# Allegro board SUB_NVP6158C_DVP_V1_0_0423_1359.brd

Outline 52 x 66.97 mm; copper layers: TOP, L2GND, L3, BOTTOM. Coordinates in mm from the lower left corner of the outline.
Outline path: 0,66.97 0,0 52,0 52,66.97 0,66.97

## Design rules (mm)
net group 1V2D_NP2: nets 1V2PLL_NP2 DVDD-CSI
net group 3V3A_NP2: nets 3V3A_NP2 AVDD-CSI-3V3
net group 3V3D_NP2: nets 3V3D_NP2 DVDD-CSI-3V3
net group 1V2A_V1_NP2: nets 1V2A_V1_NP2 1V2A_V2_NP2 1V2A_V3_NP2 1V2A_V4_NP2 1V2A_V5_NP2 AVDD-CSI
net group MG-CSI-100MIL: nets NCSI0-D0 NCSI0-D1 NCSI0-D2 NCSI0-D3 NCSI0-D4 NCSI0-D5 NCSI0-D6 NCSI0-D7 NCSI0-D8 NCSI0-D9 NCSI0-D10 NCSI0-D11 NCSI0-D12 NCSI0-D13 NCSI0-D14 NCSI0-D15 NCSI0-HSYNC NCSI0-PCLK NCSI0-VSYNC

## Placement (name value [footprint] x y rotation side)
C1  NC/0.1uF  [C0402]  14.82 30.98 0 top
C2  NC/22pF  [C0402]  17.49 35.86 90 top
C3  NC/10uF  [C0603]  14.7 32.07 0 top
C4  100nF  [C0402]  5.4 46.72 0 top
C5  100nF  [C0402]  27.14 36.37 90 top
C6  100nF  [C0402]  23.71 36.11 90 top
C7  100nF  [C0402]  22.83 36.11 90 top
C8  100nF  [C0402]  19.14 32.94 180 top
C9  100nF  [C0402]  32.48 36.11 90 top
C10  100nF  [C0402]  31.59 36.11 90 top
C11  100nF  [C0402]  28.03 36.37 90 top
C12  100nF  [C0402]  19.9 36.16 90 top
C13  100nF  [C0402]  5.53 40.16 0 top
C14  100nF  [C0402]  34.38 37.13 90 top
C15  100nF  [C0402]  33.96 35.73 180 top
C16  100nF  [C0402]  33.49 37.13 90 top
C17  100nF  [C0402]  30.57 37.38 90 top
C18  100nF  [C0402]  26.09 55.08 90 top
C19  100nF  [C0402]  30.19 35.98 180 top
C20  100nF  [C0402]  29.68 37.38 90 top
C21  100nF  [C0402]  26.25 36.87 90 top
C22  100nF  [C0402]  25.75 35.48 180 top
C23  100nF  [C0402]  25.37 36.87 90 top
C24  100nF  [C0402]  39.56 46.37 180 top
C25  100nF  [C0402]  21.81 37 90 top
C26  100nF  [C0402]  21.38 35.6 180 top
C27  100nF  [C0402]  20.92 37 90 top
C28  10uF  [C0402]  44.89 22.29 0 top
C29  10uF-6.3V  [C0402]  26.97 22.73 270 bottom
C30  100nF  [C0402]  29.28 22.75 270 bottom
C31  100nF  [C0402]  33.42 28.9 0 bottom
C32  100nF  [C0402]  30.95 22.73 270 bottom
C33  100nF  [C0402]  22.6 24.5 180 bottom
C34  100nF  [C0402]  22.39 27.09 180 bottom
C35  100nF  [C0402]  33.39 26.84 0 bottom
C36  10uF-6.3V  [C0402]  23.59 31.03 0 bottom
C37  100nF  [C0402]  23.59 29.99 0 bottom
C38  100nF  [C0402]  30.06 32.4 270 bottom
C39  100nF  [C0402]  28.87 32.4 270 bottom
C40  100nF  [C0402]  26.84 32.38 270 bottom
C41  100nF  [C0402]  24.25 32.38 270 bottom
C42  10uF-6.3V  [C0402]  31.28 28.64 180 bottom
C43  100nF  [C0402]  31.26 26.43 180 bottom
C44  100nF  [C0402]  30.24 24.65 90 bottom
C45  100nF  [C0402]  26.91 24.65 90 bottom
C46  100nF  [C0402]  23.94 26.05 0 bottom
C47  100nF  [C0402]  23.94 28.49 90 bottom
C48  10uF-6.3V  [C0402]  28.51 35.1 180 bottom
C49  NC-10uF  [C0603]  18.13 31.79 180 top
C50  100nF  [C0402]  28.51 34.21 180 bottom
C51  10uF-6.3V  [C0402]  26.18 34.16 180 bottom
C52  100nF  [C0402]  26.18 35.2 180 bottom
C53  10uF-6.3V  [C0402]  23.79 35.02 180 bottom
C54  100nF  [C0402]  23.79 34.13 180 bottom
C55  10uF-6.3V  [C0402]  21.68 30.9 90 bottom
C56  100nF  [C0402]  20.84 30.9 90 bottom
C57  NC-100nF  [C0402]  40.88 26.61 90 top
C58  10uF-6.3V  [C0402]  33.49 29.1 90 top
C59  100nF  [C0402]  34.29 29.1 90 top
C60  10uF-6.3V  [C0402]  34.64 33.7 90 top
C61  100nF  [C0402]  33.75 33.7 90 top
C62  NC/10uF  [C0603]  8.73 35.73 270 top
C63  NC/100nF  [C0402]  8.73 32.05 90 top
CC1  100nF  [C0402]  25.31 9.19 180 top
CC2  10uF  [C0603]  25.64 10.23 180 top
CC3  100nF  [C0402]  23.43 10.41 0 top
CC4  100nF  [C0402]  20.46 11.83 0 top
CC5  10uF  [C0603]  20.06 12.92 0 top
CC6  100nF  [C0402]  16.56 11.62 0 top
CC7  10uF  [C0603]  16.35 12.72 0 top
ESD1  ST5VLBD322  [SOD130_175H101]  46.18 46.78 0 top
ESD2  ST5VLBD322  [SOD130_175H101]  35.15 46.96 0 top
ESD3  ST5VLBD322  [SOD130_175H101]  22.91 46.93 0 top
ESD4  ST5VLBD322  [SOD130_175H101]  9.57 46.53 0 top
FB1  90@100M  [R0805]  21.05 15.21 90 top
FB2  90@100M  [R0805]  17.62 15.13 90 top
FB3  600R@100M-1A  [L0603]  39.26 31.18 180 top
FB4  600R@100M-1A  [L0603]  39.16 32.94 0 top
FB5  600R@100M-1A  [L0603]  42.26 34.41 270 top
FB6  600R@100M-1A  [L0603]  28.97 36.98 270 bottom
FB7  600R@100M-1A  [L0603]  26.61 36.98 270 bottom
FB8  600R@100M-1A  [L0603]  24.2 36.95 270 bottom
FB9  600R@100M-1A  [L0603]  19.8 31.24 270 bottom
FB10  600R@100M-1A  [L0603]  39.26 29.69 180 top
FB11  600R@100M-1A  [L0603]  35.78 33.98 270 top
FB12  120R@100M-1A  [L0603]  26.02 48.48 270 bottom
FB13  120R@100M-1A  [L0603]  26.18 52.5 270 top
H1  NC-HOLE  [MTH635D320]  43.79 5.24 0 top
H2  NC-HOLE  [MTH635D320]  8.21 21.01 0 top
J1  DIP  [BMW8B600_1890H700]  32.27 58.46 180 top
J2  DIP  [BMW8B600_1890H700]  19.99 58.46 180 top
J3  DIP  [BMW8B600_1890H700]  44.55 58.46 180 top
J4  NC-CON4/2.00MM/DIP_AL  [SKT1_4P200B250_850H400_V]  43.4 43.22 180 top
J5  NC-CON4/2.00MM/DIP_AL  [SKT1_4P200B250_850H400_V]  31.72 43.22 180 top
J6  NC-CON4/2.00MM/DIP_AL  [SKT1_4P200B250_850H400_V]  19.78 43.22 180 top
J7  NC-CON4/2.00MM/DIP_AL  [SKT1_4P200B250_850H400_V]  8.09 43.22 180 top
J8  DIP  [BMW8B600_1890H700]  7.71 58.46 180 top
JC1  DF40C-90DP-0.4V(58)  [SED90P40B185_1952H114-P]  26 13.12 180 bottom
L1  NC/2.2uH-2A  [LP200_250H100]  10.76 33.19 180 top
NOREF  -  []  1.49 6.77 0 top
NOREF#2  -  [unnamed#2]  50.51 3.22 0 top
NOREF#3  -  []  -0.42 -5.42 0 top
NOREF#4  -  [unnamed#2]  49.62 64.05 0 top
NOREF#5  -  []  0 66.97 0 top
NOREF#6  -  [unnamed#2]  2.38 64.05 0 top
NOREF#7  -  [unnamed#2]  4.03 5.25 0 top
NOREF#8  -  []  -11.21 -26.5 0 top
NOREF#9  -  []  52 0 90 top
NOREF#10  -  [unnamed#2]  4.03 5.25 180 bottom
NOREF#11  -  [unnamed#2]  2.38 64.05 180 bottom
NOREF#12  -  [unnamed#2]  49.62 64.05 180 bottom
NOREF#13  -  [unnamed#2]  50.51 3.22 180 bottom
OSC1  NC-27MHz-SMD  [X4B250_320H120_SMD]  38.42 27.17 270 top
Q1  BSN20  [SOT3P95B130_290H103]  44.58 29.29 90 top
Q2  BSN20  [SOT3P95B130_290H103]  45.07 24.85 180 top
Q3  MMBT3904  [SOT3P95B130_290H103]  44.62 20.17 90 top
R1  NC/100K-1%  [R0402]  16.6 35.86 90 top
R2  NC/100K-1%  [R0402]  17.11 34.33 180 top
R3  0R  [R0402]  46 40.43 180 top
R4  75R  [R0402]  31.59 38.02 270 top
R5  75R  [R0402]  12.92 40.02 90 top
R6  0.01R-1%  [R0603]  6.19 36.87 90 top
R7  0.01R-1%  [R0603]  7.46 36.87 90 top
R8  75R  [R0402]  44.57 39.99 90 top
R9  0R  [R0402]  34.29 40.46 180 top
R10  75R  [R0402]  32.32 40.46 0 top
R11  0.01R-1%  [R0603]  39.54 35.11 0 top
R12  75R  [R0402]  26.64 38.86 270 top
R13  0R  [R0402]  23.77 39.95 270 top
R14  75R  [R0402]  24.23 38.47 180 top
R15  0.01R-1%  [R0603]  37.15 33.7 270 top
R16  75R  [R0402]  22.83 38.02 270 top
R17  0R  [R0402]  11.54 40.51 0 top
R18  75R  [R0402]  17.24 32.94 0 top
R19  NC/4.7K  [R0402]  44.59 27.2 180 top
R20  2K  [R0402]  45.18 31.41 0 top
R21  NC/4.7K  [R0402]  47.16 25.01 270 top
R22  2K  [R0402]  42.99 24.63 270 top
R23  4.7K  [R0402]  45.9 17.87 180 top
R24  10K  [R0402]  43.95 17.87 0 top
R25  4.7K  [R0402]  42.99 22.83 90 top
R26  33R  [R0402]  19.14 22.78 270 top
R27  0R  [R0402]  37.27 23.56 0 top
R28  NC/0R  [R0402]  46.85 29.71 90 top
R29  NC/0R  [R0402]  46.57 27.22 180 top
R30  NC/0R  [R0402]  46.9 19.7 90 top
R31  NC-33R  [R0402]  30.19 21 270 top
R32  0R  [R0402]  31.21 21 90 top
R33  0R  [R0402]  35.32 23.56 180 top
R34  NC-22R  [R0402]  35.4 27.55 180 top
R35  33R  [R0402]  35.32 26.23 180 top
R36  0R  [R0402]  35.32 24.45 180 top
R37  0R  [R0402]  35.32 25.34 180 top
R38  NC-4K7  [R0402]  35.6 30.42 180 top
R39  4K7  [R0402]  35.6 31.31 180 top
R40  4K7  [R0402]  35.6 29.53 180 top
R41  NC-4K7  [R0402]  35.6 32.17 180 top
R42  NC-0R  [R0603]  14.57 29.13 270 top
R43  NC/0R  [R0603]  13.3 29.13 270 top
R44  NC/100K  [R0402]  14.06 36.62 0 top
R45  0R  [R0603]  6.19 34.21 90 top
R46  NC/0R  [R0603]  7.46 34.21 90 top
RC1  0R  [R0402]  32.86 9.82 90 top
RC2  0R  [R0402]  31.97 9.82 90 top
RC3  0R  [R0402]  28.11 11.07 180 top
RN1  33R*4  [RCA80-8]  18.13 29.25 0 top
RN2  33R*4  [RCA80-8]  18.13 25.57 0 top
RN3  33R*4  [RCA80-8]  23.59 20.49 90 top
RN4  33R*4  [RCA80-8]  27.27 20.62 90 top
U1  NC/SY8008B  [SOT5P95B160_300H130]  14.19 34.46 0 top
U2  NVP6158C  [QFN89P40B1000_1000H75]  27.4 28.49 270 top

## Library data of the parts
C1 C3 CC1-CC7 = CAPACITOR_0
C2 C62 C63 = C-C0402
C4-C27 C29-C48 C50-C56 C58-C61 = CAP NP_0
C28 = CAPACITOR_0: room: LVDS
C49 = CAPACITOR POL_1
C57 = CAPACITOR_0: room: TCARD
ESD1-ESD4 = 1_1.5KE100A
FB1 FB2 = INDUCTOR_3
FB3-FB11 = INDUCTOR: signal model: DEFAULT_INDUCTOR_0.001nH_1_2
FB12 FB13 = FERRITE BEAD_0
H1 H2 = HOLE
J1-J3 J8 = DIP-4PIN-360_6
J4-J7 = CON2_0
JC1 = MIPI_90_CON_F_1
L1 = L-L2520
OSC1 = OSC_2
Q1 Q2 = BSN20_0
Q3 = NPN-MMBT3904_0
R1 R2 = R-R0402-1%
R3-R5 R8-R10 R12-R14 R16-R18 R26 R31-R41 = R: room: TCARD
R6 R7 R11 R15 = R-R0603-1%
R19-R25 R27-R30 R44 = R-R0402-5%
R42 R43 = R/0603_2: room: SII9616
R45 R46 = R-R0603-5%
RC1-RC3 = R
RN1-RN4 = R-PACK4_1: User Part Number: pn; Tolerance: RichardLC; room: TCARD
U1 = SY8008B
U2 = RAPTOR3_2

## Footprints (pads in the part's own frame, mm; a bottom-side part is the same pattern mirrored in y, then rotated)
BMW8B600_1890H700
  round 2.2 hole 2.2 unplated: (0,-0.05) (0,-6.15)
  round 1.2 hole 0.8: 1(0.8,7.25) 2(-0.8,7.25) 3(-0.8,5.25) 4(0.8,5.25)
  rect 1.4x2.5 hole 0.7x1.3: 5(2.9,7.5) 6(-2.9,7.5) 7(-2.9,-2.3) 8(2.9,-2.3)
C0402
  rect 0.5x0.5 smd: 1(-0.425,0) 2(0.425,0)
C0603
  rect 0.76x0.76 smd: 1(-0.71,0) 2(0.71,0)
L0603
  rect 0.76x0.76 smd: 1(-0.71,0) 2(0.71,0)
LP200_250H100
  rect 0.8x2 smd: 1(-1,0) 2(1,0)
MTH635D320
  round 6.35 hole 3.2: 1(0,0)
QFN89P40B1000_1000H75
  rect 0.6x0.2 smd: 1(-4.9,4.2) 2(-4.9,3.8) 3(-4.9,3.4) 4(-4.9,3) 5(-4.9,2.6) 6(-4.9,2.2) 7(-4.9,1.8) 8(-4.9,1.4) 9(-4.9,1) 10(-4.9,0.6) 11(-4.9,0.2) 12(-4.9,-0.2) 13(-4.9,-0.6) 14(-4.9,-1) 15(-4.9,-1.4) 16(-4.9,-1.8) 17(-4.9,-2.2) 18(-4.9,-2.6) 19(-4.9,-3) 20(-4.9,-3.4) 21(-4.9,-3.8) 22(-4.9,-4.2) 45(4.9,-4.2) 46(4.9,-3.8) 47(4.9,-3.4) 48(4.9,-3) 49(4.9,-2.6) 50(4.9,-2.2) 51(4.9,-1.8) 52(4.9,-1.4) 53(4.9,-1) 54(4.9,-0.6) 55(4.9,-0.2) 56(4.9,0.2) 57(4.9,0.6) 58(4.9,1) 59(4.9,1.4) 60(4.9,1.8) 61(4.9,2.2) 62(4.9,2.6) 63(4.9,3) 64(4.9,3.4) 65(4.9,3.8) 66(4.9,4.2)
  rect 0.2x0.6 smd: 23(-4.2,-4.9) 24(-3.8,-4.9) 25(-3.4,-4.9) 26(-3,-4.9) 27(-2.6,-4.9) 28(-2.2,-4.9) 29(-1.8,-4.9) 30(-1.4,-4.9) 31(-1,-4.9) 32(-0.6,-4.9) 33(-0.2,-4.9) 34(0.2,-4.9) 35(0.6,-4.9) 36(1,-4.9) 37(1.4,-4.9) 38(1.8,-4.9) 39(2.2,-4.9) 40(2.6,-4.9) 41(3,-4.9) 42(3.4,-4.9) 43(3.8,-4.9) 44(4.2,-4.9) 67(4.2,4.9) 68(3.8,4.9) 69(3.4,4.9) 70(3,4.9) 71(2.6,4.9) 72(2.2,4.9) 73(1.8,4.9) 74(1.4,4.9) 75(1,4.9) 76(0.6,4.9) 77(0.2,4.9) 78(-0.2,4.9) 79(-0.6,4.9) 80(-1,4.9) 81(-1.4,4.9) 82(-1.8,4.9) 83(-2.2,4.9) 84(-2.6,4.9) 85(-3,4.9) 86(-3.4,4.9) 87(-3.8,4.9) 88(-4.2,4.9)
  rect 5.75x5.75 smd: 89(0,0)
R0402
  rect 0.5x0.5 smd: 1(-0.425,0) 2(0.425,0)
R0603
  rect 0.76x0.76 smd: 1(-0.71,0) 2(0.71,0)
R0805
  rect 0.9x1.3 smd: 1(-0.95,0) 2(0.95,0)
RCA80-8
  rect 1x0.5 smd: 1(-0.9,1.2) 2(-0.9,0.4) 3(-0.9,-0.4) 4(-0.9,-1.2) 5(0.9,-1.2) 6(0.9,-0.4) 7(0.9,0.4) 8(0.9,1.2)
SED90P40B185_1952H114-P
  rect 0.23x0.66 smd: 1(-8.8,1.355) 2(-8.8,-1.355) 3(-8.4,1.355) 4(-8.4,-1.355) 5(-8,1.355) 6(-8,-1.355) 7(-7.6,1.355) 8(-7.6,-1.355) 9(-7.2,1.355) 10(-7.2,-1.355) 11(-6.8,1.355) 12(-6.8,-1.355) 13(-6.4,1.355) 14(-6.4,-1.355) 15(-6,1.355) 16(-6,-1.355) 17(-5.6,1.355) 18(-5.6,-1.355) 19(-5.2,1.355) 20(-5.2,-1.355) 21(-4.8,1.355) 22(-4.8,-1.355) 23(-4.4,1.355) 24(-4.4,-1.355) 25(-4,1.355) 26(-4,-1.355) 27(-3.6,1.355) 28(-3.6,-1.355) 29(-3.2,1.355) 30(-3.2,-1.355) 31(-2.8,1.355) 32(-2.8,-1.355) 33(-2.4,1.355) 34(-2.4,-1.355) 35(-2,1.355) 36(-2,-1.355) 37(-1.6,1.355) 38(-1.6,-1.355) 39(-1.2,1.355) 40(-1.2,-1.355) 41(-0.8,1.355) 42(-0.8,-1.355) 43(-0.4,1.355) 44(-0.4,-1.355) 45(0,1.355) 46(0,-1.355) 47(0.4,1.355) 48(0.4,-1.355) 49(0.8,1.355) 50(0.8,-1.355) 51(1.2,1.355) 52(1.2,-1.355) 53(1.6,1.355) 54(1.6,-1.355) 55(2,1.355) 56(2,-1.355) 57(2.4,1.355) 58(2.4,-1.355) 59(2.8,1.355) 60(2.8,-1.355) 61(3.2,1.355) 62(3.2,-1.355) 63(3.6,1.355) 64(3.6,-1.355) 65(4,1.355) 66(4,-1.355) 67(4.4,1.355) 68(4.4,-1.355) 69(4.8,1.355) 70(4.8,-1.355) 71(5.2,1.355) 72(5.2,-1.355) 73(5.6,1.355) 74(5.6,-1.355) 75(6,1.355) 76(6,-1.355) 77(6.4,1.355) 78(6.4,-1.355) 79(6.8,1.355) 80(6.8,-1.355) 81(7.2,1.355) 82(7.2,-1.355) 83(7.6,1.355) 84(7.6,-1.355) 85(8,1.355) 86(8,-1.355) 87(8.4,1.355) 88(8.4,-1.355) 89(8.8,1.355) 90(8.8,-1.355)
  rect 0.35x0.66 smd: 91(-9.275,1.355) 92(-9.275,-1.355) 93(9.275,1.355) 94(9.275,-1.355)
SKT1_4P200B250_850H400_V
  round 1.4 hole 0.8: 1(-3,0) 2(-1,0) 3(1,0) 4(3,0)
SOD130_175H101
  rect 0.8x0.8 smd: 1(-1.1,0) 2(1.1,0)
SOT3P95B130_290H103
  rect 0.95x0.46 smd: 1(-0.975,0.95) 2(-0.975,-0.95) 3(0.975,0)
SOT5P95B160_300H130
  rect 0.8x0.55 smd: 1(-1.2,0.95) 2(-1.2,0) 3(-1.2,-0.95) 4(1.2,-0.95) 5(1.2,0.95)
unnamed#2
  round 0.76 smd: (0,0)
X4B250_320H120_SMD
  rect 0.95x1.2 smd: 1(-0.875,1.1) 2(-0.875,-1.1) 3(0.875,-1.1) 4(0.875,1.1)

## Nets
1V2A_V1_NP2: C48.1 C50.1 FB6.2 U2.6(VDD1A_1)
1V2A_V2_NP2: C51.1 C52.1 FB7.2 U2.12(VDD1A_2)
1V2A_V3_NP2: C53.1 C54.1 FB8.2 U2.18(VDD1A_3)
1V2A_V4_NP2: C55.1 C56.1 FB9.2 U2.30(VDD1A_4)
1V2A_V5_NP2: C60.1 C61.1 FB11.2 U2.88(VDD1A_5)
1V2D_NP2: C29.1 C30.1 C31.1 C32.1 C33.1 C34.1 C35.1 FB3.2 U2.35(VDD1D_1) U2.46(VDD1D_2) U2.57(VDD1D_3) U2.58(VDD1D_4) U2.66(VDD1D_5) U2.75(VDD1D_6) U2.79(VDD1D_7)
1V2PLL_NP2: C58.1 C59.1 FB10.2 U2.78(VDD1A-PLL)
3V3A_NP2: C36.1 C37.1 C38.1 C39.1 C40.1 C41.1 FB4.2 U2.3(VDD3A_1) U2.9(VDD3A_2) U2.15(VDD3A_3) U2.21(VDD3A_4) U2.29(VDD3A_5) U2.31(VDD3A_6)
3V3D_NP2: C42.1 C43.1 C44.1 C45.1 C46.1 C47.1 FB5.2 U2.34(VDD3D_1) U2.45(VDD3D_2) U2.56(VDD3D_3) U2.65(VDD3D_4) U2.74(VDD3D_5) U2.80(VDD3D_6)
AVDD-CSI: FB6.1 FB7.1 FB8.1 FB9.1 FB11.1 R7.2
AVDD-CSI-3V3: C57.1 FB4.1 OSC1.4(VCC) R15.2 R38.1 R39.1
DVDD-CSI: FB3.1 FB10.1 R6.2
DVDD-CSI-1V2: CC3.2 JC1.56(P56) JC1.58(P58) R45.1
DVDD-CSI-3V3: FB5.1 R11.2 R20.2 R22.2 R25.2
GND: C1.1 C3.1 C4.2 C13.2 C14.2 C16.2 C17.2 C18.2 C20.2 C21.2 C23.2 C24.2 C25.2 C27.2 C28.2 C29.2 C30.2 C31.2 C32.2 C33.2 C34.2 C35.2 C36.2 C37.2 C38.2 C39.2 C40.2 C41.2 C42.2 C43.2 C44.2 C45.2 C46.2 C47.2 C48.2 C49.2 C50.2 C51.2 C52.2 C53.2 C54.2 C55.2 C56.2 C57.2 C58.2 C59.2 C60.2 C61.2 C62.1 C63.1 CC1.1 CC2.1 CC3.1 CC4.1 CC5.1 CC6.1 CC7.1 ESD1.2(CATHODE) ESD2.2(CATHODE) ESD3.2(CATHODE) ESD4.2(CATHODE) FB12.2 FB13.2 H1.1 H2.1 J1.5(GND0) J1.6(GND1) J1.7(GND2) J1.8(GND3) J2.5(GND0) J2.6(GND1) J2.7(GND2) J2.8(GND3) J3.5(GND0) J3.6(GND1) J3.7(GND2) J3.8(GND3) J4.2 J5.2 J6.2 J7.2 J8.5(GND0) J8.6(GND1) J8.7(GND2) J8.8(GND3) JC1.1(P1) JC1.7(P7) JC1.10(P10) JC1.13(P13) JC1.14(P14) JC1.18(P18) JC1.19(P19) JC1.20(P20) JC1.25(P25) JC1.26(P26) JC1.28(P28) JC1.30(P30) JC1.31(P31) JC1.36(P36) JC1.37(P37) JC1.40(P40) JC1.42(P42) JC1.43(P43) JC1.46(P46) JC1.49(P49) JC1.50(P50) JC1.54(P54) JC1.55(P55) JC1.60(P60) JC1.61(P61) JC1.62(P62) JC1.64(P64) JC1.67(P67) JC1.73(P73) JC1.74(P74) JC1.76(P76) JC1.78(P78) JC1.79(P79) JC1.80(P80) JC1.82(P82) JC1.85(P85) JC1.91(P91) JC1.92(P92) JC1.93(P93) JC1.94(P94) OSC1.2(GND) R2.2 R4.1 R5.1 R8.1 R10.1 R12.1 R14.1 R16.1 R18.1 R40.1 R41.1 U1.2(GND) U2.87(TEST) U2.89(PGND)
VCC-1V2: C2.2 C62.2 C63.2 L1.2 R1.2 R46.1
VCC-3V3-DEV: FB2.2 R11.1 R15.1 R42.2
VCC-5V: C4.1 C13.1 C18.1 C24.1 FB1.2 J1.4(VCC) J2.4(VCC) J3.4(VCC) J4.4 J5.4 J6.4 J7.4 J8.4(VCC) R43.2
VCCIO-CAM: CC1.2 CC2.2 JC1.52(P52) Q1.1(GATE) Q2.1(GATE) R19.2 R21.2 R23.2 R24.2
AHD-ADC-REFCLK: OSC1.3(OUT) R34.1
AHD-I2C-SCL: Q1.3(DRAIN) R20.1 R28.2 R37.1
AHD-I2C-SDA: Q2.3(DRAIN) R22.1 R29.2 R36.1
AHD-NCSI0-MCLK: JC1.11(P11) R35.1
AHD-SYS-RSTN: R27.1 R33.1
HD1: ESD1.1(ANODE) J3.2(CVBS) J4.1 R3.1
HD2: ESD2.1(ANODE) J1.2(CVBS) J5.1 R9.1
HD3: ESD3.1(ANODE) J2.2(CVBS) J6.1 R13.1
HD4: ESD4.1(ANODE) J7.1 J8.2(CVBS) R17.1
NCSI0-D0: JC1.15(P15) RN1.1(R1)
NCSI0-D1: JC1.17(P17) RN1.2(R2)
NCSI0-D2: JC1.3(P3) RN1.3(R3)
NCSI0-D3: JC1.5(P5) RN1.4(R4)
NCSI0-D4: JC1.27(P27) RN2.1(R1)
NCSI0-D5: JC1.29(P29) RN2.2(R2)
NCSI0-D6: JC1.33(P33) RN2.3(R3)
NCSI0-D7: JC1.35(P35) RN2.4(R4)
NCSI0-D8: JC1.39(P39) RN3.1(R1)
NCSI0-D9: JC1.41(P41) RN3.2(R2)
NCSI0-D10: JC1.45(P45) RN3.3(R3)
NCSI0-D11: JC1.47(P47) RN3.4(R4)
NCSI0-D12: JC1.51(P51) RN4.1(R1)
NCSI0-D13: JC1.53(P53) RN4.2(R2)
NCSI0-D14: JC1.57(P57) RN4.3(R3)
NCSI0-D15: JC1.59(P59) RN4.4(R4)
NCSI0-HSYNC: JC1.21(P21)
NCSI0-PCLK: JC1.9(P9) R26.2 R31.2
NCSI0-VSYNC: JC1.23(P23)
NCSI-I2C-SCL: JC1.8(P8) Q1.2(SOURCE) R19.1 R28.1
NCSI-I2C-SDA: JC1.6(P6) Q2.2(SOURCE) R21.1 R29.1
PE15: RC1.1
PK22: RC3.1
RSTN: Q3.2(E) R23.1 R30.1 RC2.1
S_GND: FB12.1 J1.1(GND) J2.1(GND) J3.1(GND) J8.1(GND)
SS_GND: FB13.1 J1.3(DET) J2.3(DET) J3.3(DET) J8.3(DET)
N19621503: R36.2 U2.72(SDA)
N19621508: R37.2 U2.73(SCL)
N19621532: R38.2 R40.2 U2.85(SA0)
N19621534: R39.2 R41.2 U2.86(SA1)
N19621611: C9.2 R3.2 R8.2
N19621702: C11.2 R9.2 R10.2
N19621721: C7.2 R16.2
N19621766: C6.2 R13.2 R14.2
N19621772: RN1.8(R8) U2.36(VDO2-0)
N19621774: RN1.7(R7) U2.37(VDO2-1)
N19621776: RN1.6(R6) U2.38(VDO2-2)
N19621778: RN1.5(R5) U2.39(VDO2-3)
N19621780: RN2.8(R8) U2.40(VDO2-4)
N19621782: RN2.7(R7) U2.41(VDO2-5)
N19621784: RN3.8(R8) U2.47(VDO3-0)
N19621786: RN3.7(R7) U2.48(VDO3-1)
N19621788: RN3.6(R6) U2.49(VDO3-2)
N19621790: RN3.5(R5) U2.50(VDO3-3)
N19621792: RN4.8(R8) U2.51(VDO3-4)
N19621794: RN4.7(R7) U2.52(VDO3-5)
N19621798: RN4.6(R6) U2.53(VDO3-6)
N19621800: RN4.5(R5) U2.54(VDO3-7)
N19621804: RN2.6(R6) U2.42(VDO2-6)
N19621806: RN2.5(R5) U2.43(VDO2-7)
N19621808: R26.1 U2.44(VCLK2)
N19621810: R31.1 U2.55(VCLK3)
N19621815: C12.2 R5.2 R17.2
N19621866: R34.2 R35.2 U2.76(SYS-CLK)
N19622220: C49.1 U2.33(VREF)
N19622226: C9.1 U2.4(VIN1)
N19622228: C11.1 U2.10(VIN2)
N19622230: C10.1 U2.5(VCM1)
N19622263: R33.2 U2.71(RSTB)
N19622273: R32.2 U2.59(IRQ)
N19622360: C6.1 U2.16(VIN3)
N19622362: C7.1 U2.17(VCM3)
N19622364: C12.1 U2.22(VIN4)
N19622366: C8.1 U2.23(VCM4)
N19622368: C8.2 R18.2
N19622370: C10.2 R4.2
N19622372: C14.1 C15.1 U2.1(REFT1)
N19622376: C15.2 C16.1 U2.2(REFB1)
N19622380: C17.1 C19.1 U2.7(REFT2)
N19622384: C19.2 C20.1 U2.8(REFB2)
N19622388: C21.1 C22.1 U2.13(REFT3)
N19622392: C22.2 C23.1 U2.14(REFB3)
N19622396: C25.1 C26.1 U2.19(REFT4)
N19622400: C26.2 C27.1 U2.20(REFB4)
N24481592: JC1.12(P12) RC1.2
N24481626: JC1.48(P48) RC3.2
N24481661: JC1.16(P16) RC2.2
N24481697: CC4.2 CC5.2 FB1.1 JC1.66(P66) JC1.68(P68) JC1.70(P70) JC1.72(P72)
N24481712: CC6.2 CC7.2 FB2.1 JC1.84(P84) JC1.86(P86) JC1.88(P88) JC1.90(P90)
N24486605: R6.1 R7.1 R45.2 R46.2
N24498521: C5.1 U2.11(VCM2)
N24498524: C5.2 R12.2
N24503610: C28.1 Q3.3(C) R25.1 R27.2 R30.2
N24503716: Q3.1(B) R24.1
N24516822: C2.1 R1.1 R2.1 U1.5(FB)
N24516872: C1.2 C3.2 R42.1 R43.1 R44.2 U1.4(IN)
N24516874: L1.1 U1.3(LX)
N24516932: R44.1 U1.1(EN)

Pads without a net: J4 3; J5 3; J6 3; J7 3; JC1 2 4 22 24 32 34 38 44 63 65 69 71 75 77 81 83 87 89; OSC1 1; R32 1; U2 24 25 26 27 28 32 60 61 62 63 64 67 68 69 70 77 81 82 83 84

## Via types
v1: diameter 0.406, hole 0.203, TOP to BOTTOM, 672 vias

## Routing (per net, layer and track width the routed paths; a pad name or vN(x,y) marks a point on that pad's centre or on a via; arc(x,y) is an arc through that point)
1V2A_V1_NP2: length 3.5
  TOP w0.203: U2.6 v1(29.6,34.12)
  BOTTOM w0.508: FB6.2 28.97,35.13 C48.1 C50.1 29.51,34.21 v1(29.6,34.12)
1V2A_V2_NP2: length 3.4
  TOP w0.203: U2.12 v1(27.2,34)
  BOTTOM w0.508: v1(27.2,34) 27.04,34.16 C51.1 C52.1 26.61,35.2 FB7.2
1V2A_V3_NP2: length 3.4
  TOP w0.203: U2.18 v1(24.8,34.11)
  BOTTOM w0.508: FB8.2 24.2,35.04 C53.1 C54.1 24.77,34.13 v1(24.8,34.11)
1V2A_V4_NP2: length 3.2
  TOP w0.203: U2.30 v1(21.78,29.89)
  BOTTOM w0.508: FB9.2 20.8,30.53 C56.1 C55.1 21.68,29.99 v1(21.78,29.89)
1V2A_V5_NP2: length 3.7
  TOP w0.203: 32.99,32.94 32.74,32.69 U2.88
  TOP w0.508: 32.99,32.94 33.32,33.27 C61.1 C60.1 35.75,33.27 35.75,33.27 FB11.2
1V2D_NP2: length 30.7
  TOP w0.203: v1(23.84,24.22) 23.8,24.22 23.6,24.02 U2.46 ; U2.35 22.93,27.89 23.13,27.69 v1(23.13,27.63) ; U2.57 28,23.1 v1(27.88,22.98) ; U2.66 v1(32.05,23.59) ; v1(28.51,22.95) 28.4,23.07 U2.58 ; v1(32.91,29.46) 32.91,29.39 32.61,29.09 U2.79 ; U2.75 v1(32.95,27.49)
  TOP w0.508: FB3.2 37.79,31.18 37.74,31.13 37.74,31.13 v1(36.8,30.19)
  L3 w0.508: v1(32.91,29.46) 34.28,29.46 35.02,30.19 v1(36.8,30.19)
  BOTTOM w0.508: v1(32.91,29.46) 32.99,29.38 32.99,29 32.99,28.99 C31.1 32.95,28.86 v1(32.95,27.49) 32.97,27.48 C35.1 32.97,24.51 v1(32.05,23.59) 31.61,23.16 C32.1 30.93,23.18 C30.1 28.74,23.18 v1(28.51,22.95) 27.91,22.95 v1(27.88,22.98) 27.71,23.15 C29.1 24.91,23.15 v1(23.84,24.22) 23.56,24.5 C33.1 22.83,24.7 22.83,26.46 22.82,26.46 C34.1 22.82,27.32 v1(23.13,27.63)
1V2PLL_NP2: length 6.7
  TOP w0.203: 32.86,28.69 U2.78
  TOP w0.508: 32.86,28.69 32.87,28.68 C58.1 C59.1 34.29,28.71 34.48,28.9 36.82,28.9 36.85,28.92 37.13,28.92 37.89,29.69 FB10.2
3V3A_NP2: length 25.1
  TOP w0.203: v1(23.16,30.55) 23.16,30.5 22.96,30.29 U2.29 ; U2.15 26,32.83 v1(25.97,32.8) ; v1(23.16,29.41) 23.06,29.41 22.97,29.49 U2.31 ; U2.9 28.4,32.9 v1(28.21,32.71) ; U2.21 23.6,32.82 v1(23.54,32.76) ; U2.3 v1(30.8,32.79)
  TOP w0.508: v1(39.49,32.2) 39.87,32.58 FB4.2
  L3 w0.508: v1(30.8,32.79) 31.05,33.04 37.63,33.04 38.47,32.2 v1(39.49,32.2)
  BOTTOM w0.508: v1(23.16,29.41) 23.16,29.81 23.16,29.81 C37.1 23.16,29.99 v1(23.16,30.55) 23.13,30.57 23.13,31 C36.1 23.13,31.06 23.13,32.36 v1(23.54,32.76) 23.58,32.8 C41.1 v1(25.97,32.8) C40.1 28.12,32.8 v1(28.21,32.71) 28.33,32.83 C39.1 C38.1 30.76,32.83 v1(30.8,32.79)
3V3D_NP2: length 39.2
  TOP w0.203: 23.2,24.3 U2.45 ; v1(30.91,24.3) 31.05,24.3 31.2,24.16 U2.65 ; U2.74 v1(31.69,27.09) ; v1(31.69,29.28) 31.69,29.3 31.88,29.49 U2.80 ; U2.34 v1(23.18,28.29) ; v1(27.6,24.2) U2.56
  TOP w0.508: v1(23.48,25.32) 23.2,25.04 23.2,24.3 ; FB5.2 v1(42.26,32.76)
  L3 w0.508: v1(31.69,29.28) 31.69,30.24 32.86,31.41 37.05,31.41 39.46,29 40.68,29 42.26,30.57 v1(42.26,32.76)
  BOTTOM w0.508: v1(31.69,29.28) 31.71,29.27 C42.1 31.71,27.11 v1(31.69,27.09) 31.68,27.09 C43.1 31.68,25.07 v1(30.91,24.3) 30.83,24.3 30.75,24.22 C44.1 30.22,24.2 v1(27.6,24.2) 27.57,24.22 C45.1 24.96,24.22 23.86,25.32 v1(23.48,25.32) 23.52,25.36 C46.1 23.52,27.05 23.94,27.48 C47.1 23.78,28.07 23.56,28.29 v1(23.18,28.29)
AVDD-CSI: length 37.4
  TOP w0.508: v1(19.46,34.48) 18.25,35.68 18.25,36.62 17.29,37.59 15.21,37.59 15.03,37.76 12.67,37.76 12.49,37.59 7.46,37.59 R7.2 ; FB11.1 35.78,37.66 v1(35.75,37.69)
  L3 w0.508: v1(32.32,37.69) v1(35.75,37.69)
  BOTTOM w0.508: v1(32.32,37.69) FB6.1 FB7.1 24.22,37.69 FB8.1 22.42,37.66 19.46,34.7 v1(19.46,34.48) 19.8,34.13 FB9.1
AVDD-CSI-3V3: length 17.8
  TOP w0.508: R38.1 R39.1 36.89,31.31 37.4,31.82 37.4,32.54 37.15,32.79 R15.2 37.2,32.94 FB4.1 39.5,33.99 40.66,33.99 41.16,33.49 41.16,29.18 41.77,28.57 41.77,26.94 41.49,26.66 41.49,26.64 41.04,26.19 C57.1 40.78,26.3 OSC1.4
DVDD-CSI: length 42.2
  TOP w0.508: FB10.1 39.97,30.42 v1(39.94,30.45) 39.97,30.47 FB3.1 ; v1(18.89,37.64) 17.62,38.91 6.7,38.91 6.19,38.4 R6.2
  L3 w0.508: v1(18.89,37.64) 19.98,36.54 36.9,36.54 40.61,32.84 40.61,30.96 40.1,30.45 v1(39.94,30.45)
DVDD-CSI-1V2: length 43
  TOP w0.508: R45.1 6.19,28.87 13.68,21.38 13.68,9.31 15.19,7.81 v1(23.86,7.81) ; v1(23.77,11.04) 23.86,10.95 CC3.2 v1(23.86,9.59)
  L3 w0.508: v1(23.86,9.59) v1(23.86,7.81)
  BOTTOM w0.254: JC1.58 23.6,11.21 v1(23.77,11.04) 24,11.28 JC1.56
DVDD-CSI-3V3: length 18.1
  TOP w0.508: R25.2 R22.2 43.9,24.21 v1(43.98,24.12) ; v1(45.53,30.7) 45.53,31.34 R20.2 45.6,32.04 45.53,32.12 45.53,33.68 44.09,35.12 FB5.1 42.21,35.12 42.2,35.11 R11.2
  L3 w0.508: v1(45.53,30.7) 45.53,30.54 43.98,29 v1(43.98,24.12)
GND: length 508.4
  TOP w0.114: 21.96,15.44 22.01,15.49 22.01,17.65
  TOP w0.203: U2.87 v1(32.97,32.29) ; U1.2 13.43,34.46 v1(13.81,34.08)
  TOP w0.254: R5.1 v1(13.5,39.59) ; v1(20,11.12) 20.04,11.16 CC4.1 ; CC5.1 19.95,12.92 v1(20.03,12.92) ; v1(40.3,25.57) 40.25,25.57 40.22,25.55 38.6,25.55 v1(38.4,25.75) 38.19,25.55 36.67,25.55 36.29,25.93 36.29,26.51 35.88,26.92 v1(35.4,26.92)
  TOP w0.508: v1(22.27,38.6) 22.29,38.6 22.62,38.27 22.65,38.27 R16.1 ; C4.2 v1(5.82,47.35) ; J8.7 10.61,62.19 ; J8.7 9.73,60.76 ; J8.7 11.49,60.76 ; J8.7 10.61,59.34 ; 28.49,50.96 J1.5 ; J1.5 30.25,50.96 ; J1.5 29.37,49.54 ; J1.5 29.37,52.39 ; J8.8 4.81,62.19 ; J8.8 5.69,60.76 ; J8.8 3.93,60.76 ; J8.8 4.81,59.34 ; J8.5 5.69,50.96 ; J8.5 4.81,52.39 ; J8.5 4.81,49.54 ; J8.5 3.93,50.96 ; R41.1 v1(36.67,32.17) ; J2.8 17.97,60.76 ; J2.8 17.09,59.34 ; J2.8 16.21,60.76 ; J2.8 17.09,62.19 ; R10.1 31.89,40.53 31.77,40.66 v1(31.77,41.17) ; CC3.1 23.01,10.01 v1(22.85,9.85) ; J2.7 22.89,62.19 ; J2.7 22.01,60.76 ; J2.7 23.77,60.76 ; J2.7 22.89,59.34 ; H1.1 43.79,8.59 ; H1.1 40.44,5.24 ; H1.1 43.79,1.88 ; H1.1 47.14,5.24 ; 28.49,60.76 J1.8 ; J1.8 29.37,62.19 ; J1.8 30.25,60.76 ; J1.8 29.37,59.34 ; J3.8 42.53,60.76 ; J3.8 40.77,60.76 ; J3.8 41.65,62.19 ; J3.8 41.65,59.34 ; 10.61,49.54 J8.6 ; J8.6 9.73,50.96 ; J8.6 10.61,52.39 ; J8.6 11.49,50.96 ; CC6.1 v1(15.51,11.62) ; J4.2 45.28,43.22 ; J4.2 43.52,43.22 ; J4.2 44.4,44.1 ; J4.2 44.4,42.35 ; CC2.1 v1(27.17,10.23) ; 8.21,43.22 J7.2 ; J7.2 9.97,43.22 ; J7.2 9.09,44.1 ; J7.2 9.09,42.35 ; C18.2 v1(26.98,55.5) ; J5.2 33.59,43.22 ; J5.2 32.72,42.35 ; J5.2 32.72,44.1 ; J5.2 31.84,43.22 ; J2.5 17.97,50.96 ; J2.5 17.09,52.39 ; J2.5 16.21,50.96 ; J2.5 17.09,49.54 ; 35.17,59.34 J1.7 ; J1.7 35.17,62.19 ; J1.7 36.05,60.76 ; J1.7 34.29,60.76 ; 47.45,59.34 J3.7 ; J3.7 48.33,60.76 ; J3.7 46.57,60.76 ; J3.7 47.45,62.19 ; R4.1 v1(31.59,39.08) ; J1.6 35.17,52.39 ; J1.6 35.17,49.54 ; J1.6 36.05,50.96 ; J1.6 34.29,50.96 ; v1(35.25,28.24) 36.26,28.24 36.45,28.05 OSC1.2 37.42,28.05 v1(38.05,28.68) 38.29,28.92 40.25,28.92 40.83,28.34 v1(40.83,27.7) 40.83,27.09 C57.2 ; 46.57,50.96 J3.6 ; J3.6 47.45,49.54 ; J3.6 47.45,52.39 ; J3.6 48.33,50.96 ; R8.1 v1(45.23,39.57) ; 8.21,24.37 H2.1 11.56,21.01 ; C21.2 C23.2 v1(25.37,38.25) ; R14.1 v1(24.65,39.21) ; ESD3.2 v1(24.91,46.93) ; v1(39.14,47.17) 39.14,47.17 C24.2 ; C60.2 34.64,34.27 v1(34.19,34.72) 33.75,34.28 C61.2 ; J2.6 23.77,50.96 ; J2.6 22.89,49.54 ; J2.6 22.89,52.39 ; J2.6 22.01,50.96 ; C58.2 33.49,29.79 v1(33.85,30.14) 34.26,29.74 34.26,29.56 C59.2 ; C13.2 v1(5.95,40.93) ; R40.1 v1(36.64,29.53) ; ESD2.2 v1(35.42,46.96) ; ESD1.2 v1(47.28,47.68) ; 41.65,49.54 J3.5 ; J3.5 42.53,50.96 ; J3.5 40.77,50.96 ; J3.5 41.65,52.39 ; R18.1 v1(16.81,33.55) ; CC7.1 v1(15.64,13.51) ; C27.2 v1(20.92,38.04) ; 20.78,42.35 J6.2 ; J6.2 19.9,43.22 ; J6.2 20.78,44.1 ; J6.2 21.66,43.22 ; v1(16.6,31.54) 16.86,31.79 C49.2 ; ESD4.2 v1(11.52,46.53) ; C17.2 v1(30.57,38.42) ; R12.1 v1(26.03,39.29) ; C25.2 v1(21.81,38.09) ; FB13.2 v1(27.13,51.79) ; C14.2 v1(34.38,38.32) ; C16.2 v1(33.49,38.32) ; CC1.1 v1(26.48,9.19) ; C20.2 v1(29.68,38.45) ; C28.2 v1(45.96,22.29)
  L2GND w0.508: J3.7 47.45,62.19 ; J3.7 46.57,60.76 ; J3.7 47.45,59.34 ; J3.7 48.33,60.76 ; 29.37,49.54 J1.5 ; J1.5 29.37,52.39 ; J1.5 30.25,50.96 ; J1.5 28.49,50.96 ; 41.65,49.54 J3.5 ; J3.5 40.77,50.96 ; J3.5 41.65,52.39 ; J3.5 42.53,50.96 ; J1.6 35.17,52.39 ; J1.6 34.29,50.96 ; J1.6 35.17,49.54 ; J1.6 36.05,50.96 ; J1.8 29.37,62.19 ; J1.8 30.25,60.76 ; J1.8 29.37,59.34 ; J1.8 28.49,60.76 ; 10.61,59.34 J8.7 ; J8.7 10.61,62.19 ; J8.7 9.73,60.76 ; J8.7 11.49,60.76 ; 47.45,49.54 J3.6 ; J3.6 46.57,50.96 ; J3.6 47.45,52.39 ; J3.6 48.33,50.96 ; J8.5 5.69,50.96 ; J8.5 4.81,49.54 ; J8.5 4.81,52.39 ; J8.5 3.93,50.96 ; J2.7 23.77,60.76 ; J2.7 22.01,60.76 ; J2.7 22.89,59.34 ; J2.7 22.89,62.19 ; J3.8 42.53,60.76 ; J3.8 40.77,60.76 ; J3.8 41.65,59.34 ; J3.8 41.65,62.19 ; 17.09,59.34 J2.8 ; J2.8 17.09,62.19 ; J2.8 16.21,60.76 ; J2.8 17.97,60.76 ; 8.21,43.22 J7.2 ; J7.2 9.09,44.1 ; J7.2 9.97,43.22 ; J7.2 9.09,42.35 ; 44.4,42.35 J4.2 ; J4.2 43.52,43.22 ; J4.2 45.28,43.22 ; J4.2 44.4,44.1 ; J2.5 17.09,52.39 ; J2.5 16.21,50.96 ; J2.5 17.97,50.96 ; J2.5 17.09,49.54 ; J5.2 33.59,43.22 ; J5.2 32.72,44.1 ; J5.2 31.84,43.22 ; J5.2 32.72,42.35 ; 34.29,60.76 J1.7 ; J1.7 36.05,60.76 ; J1.7 35.17,59.34 ; J1.7 35.17,62.19 ; H1.1 43.79,8.59 ; H1.1 40.44,5.24 ; H1.1 47.14,5.24 ; H1.1 43.79,1.88 ; J2.6 23.77,50.96 ; J2.6 22.89,49.54 ; J2.6 22.89,52.39 ; J2.6 22.01,50.96 ; J8.6 11.49,50.96 ; J8.6 10.61,49.54 ; J8.6 10.61,52.39 ; J8.6 9.73,50.96 ; 19.9,43.22 J6.2 ; J6.2 20.78,44.1 ; J6.2 21.66,43.22 ; J6.2 20.78,42.35 ; 4.86,21.01 H2.1 ; H2.1 11.56,21.01 ; H2.1 8.21,17.66 ; H2.1 8.21,24.37 ; 4.81,59.34 J8.8 ; J8.8 4.81,62.19 ; J8.8 3.93,60.76 ; J8.8 5.69,60.76
  L3 w0.508: J4.2 44.4,44.1 ; J4.2 45.28,43.22 ; J4.2 44.4,42.35 ; J4.2 43.52,43.22 ; 22.89,59.34 J2.7 ; J2.7 22.01,60.76 ; J2.7 22.89,62.19 ; J2.7 23.77,60.76 ; 40.44,5.24 H1.1 ; H1.1 43.79,1.88 ; H1.1 47.14,5.24 ; H1.1 43.79,8.59 ; 40.77,50.96 J3.5 ; J3.5 42.53,50.96 ; J3.5 41.65,52.39 ; 3.93,60.76 J8.8 ; J8.8 4.81,62.19 ; J8.8 4.81,59.34 ; J8.8 5.69,60.76 ; 20.78,42.35 J6.2 ; J6.2 20.78,44.1 ; J6.2 19.9,43.22 ; J6.2 21.66,43.22 ; J5.2 33.59,43.22 ; J5.2 32.72,42.35 ; J5.2 31.84,43.22 ; J5.2 32.72,44.1 ; J3.6 48.33,50.96 ; J3.6 47.45,52.39 ; J3.6 47.45,49.54 ; J3.6 46.57,50.96 ; 29.37,59.34 J1.8 ; J1.8 28.49,60.76 ; J1.8 29.37,62.19 ; J1.8 30.25,60.76 ; J8.6 11.49,50.96 ; J8.6 10.61,52.39 ; J8.6 9.73,50.96 ; J3.8 41.65,62.19 ; J3.8 41.65,59.34 ; J3.8 42.53,60.76 ; J3.8 40.77,60.76 ; J1.6 35.17,52.39 ; J1.6 34.29,50.96 ; J1.6 36.05,50.96 ; J2.6 23.77,50.96 ; J2.6 22.89,49.54 ; J2.6 22.89,52.39 ; J2.6 22.01,50.96 ; 4.81,49.54 J8.5 ; J8.5 5.69,50.96 ; J8.5 4.81,52.39 ; J8.5 3.93,50.96 ; J2.5 17.09,52.39 ; J2.5 16.21,50.96 ; J2.5 17.97,50.96 ; J3.7 48.33,60.76 ; J3.7 47.45,62.19 ; J3.7 46.57,60.76 ; J3.7 47.45,59.34 ; J7.2 9.09,44.1 ; J7.2 8.21,43.22 ; J7.2 9.97,43.22 ; J7.2 9.09,42.35 ; J1.7 36.05,60.76 ; J1.7 35.17,62.19 ; J1.7 35.17,59.34 ; J1.7 34.29,60.76 ; J2.8 17.97,60.76 ; J2.8 17.09,59.34 ; J2.8 17.09,62.19 ; J2.8 16.21,60.76 ; 9.73,60.76 J8.7 ; J8.7 10.61,59.34 ; J8.7 11.49,60.76 ; J8.7 10.61,62.19 ; 28.49,50.96 J1.5 ; J1.5 30.25,50.96 ; J1.5 29.37,52.39 ; J1.5 29.37,49.54 ; H2.1 11.56,21.01 ; H2.1 4.86,21.01 ; H2.1 8.21,24.37 ; H2.1 8.21,17.66
  BOTTOM w0.127: 22.95,28.85 23.87,28.85 C47.2
  BOTTOM w0.203: v1(26.13,22.36) 26.42,22.07 26.74,22.07 C29.2 ; v1(24.02,13.84) 24,13.85 JC1.55
  BOTTOM w0.229: JC1.80 v1(19.2,11.12) ; v1(19.2,11.12) 19.75,11.12 19.88,11.25 19.88,11.27 20,11.39 v1(20,11.12) 20.4,11.52 JC1.74 ; v1(19.2,11.12) 19.28,11.2 19.42,11.2 19.56,11.34 19.56,11.47 19.6,11.52 JC1.78
  BOTTOM w0.254: v1(24.4,12.4) JC1.54
  BOTTOM w0.508: J2.7 23.77,60.76 ; J2.7 22.89,62.19 ; J2.7 22.89,59.34 ; J2.7 22.01,60.76 ; 32.72,42.35 J5.2 ; J5.2 31.84,43.22 ; J5.2 32.72,44.1 ; J5.2 33.59,43.22 ; J1.7 36.05,60.76 ; J1.7 35.17,59.34 ; J1.7 34.29,60.76 ; J1.7 35.17,62.19 ; C30.2 29.51,22.1 v1(30.03,22.1) ; 3.93,60.76 J8.8 ; J8.8 5.69,60.76 ; J8.8 4.81,62.19 ; J8.8 4.81,59.34 ; 9.73,50.96 J8.6 ; J8.6 11.49,50.96 ; J8.6 10.61,52.39 ; J8.6 10.61,49.54 ; 40.77,50.96 J3.5 ; J3.5 41.65,49.54 ; J3.5 42.53,50.96 ; J3.5 41.65,52.39 ; 28.49,60.76 J1.8 ; J1.8 29.37,62.19 ; J1.8 29.37,59.34 ; J1.8 30.25,60.76 ; C52.2 v1(25.75,34.66) C51.2 ; J2.6 23.77,50.96 ; J2.6 22.01,50.96 ; J2.6 22.89,52.39 ; J3.8 41.65,62.19 ; J3.8 41.65,59.34 ; J3.8 42.53,60.76 ; J3.8 40.77,60.76 ; J8.7 11.49,60.76 ; J8.7 9.73,60.76 ; J8.7 10.61,62.19 ; J8.7 10.61,59.34 ; FB12.2 v1(26.91,47.77) 26.91,47.77 ; 16.21,50.96 J2.5 ; J2.5 17.97,50.96 ; J2.5 17.09,52.39 ; J2.5 17.09,49.54 ; 46.57,50.96 J3.6 ; J3.6 47.45,49.54 ; J3.6 48.33,50.96 ; J3.6 47.45,52.39 ; J7.2 9.09,44.1 ; J7.2 9.97,43.22 ; J7.2 9.09,42.35 ; J7.2 8.21,43.22 ; 46.57,60.76 J3.7 ; J3.7 47.45,59.34 ; J3.7 47.45,62.19 ; J3.7 48.33,60.76 ; C50.2 28.09,34.26 ; 28.09,34.26 v1(27.51,34.84) 27.5,34.84 27.75,35.1 C48.2 28.09,34.26 ; C55.2 v1(21.68,31.9) ; 44.4,42.35 J4.2 ; J4.2 43.52,43.22 ; J4.2 45.28,43.22 ; J4.2 44.4,44.1 ; J1.5 29.37,52.39 ; J1.5 30.25,50.96 ; J1.5 28.49,50.96 ; 20.78,42.35 J6.2 ; J6.2 21.66,43.22 ; J6.2 19.9,43.22 ; J6.2 20.78,44.1 ; J2.8 17.09,62.19 ; J2.8 16.21,60.76 ; J2.8 17.09,59.34 ; J2.8 17.97,60.76 ; 3.93,50.96 J8.5 ; J8.5 4.81,49.54 ; J8.5 4.81,52.39 ; J8.5 5.69,50.96 ; 40.44,5.24 H1.1 ; H1.1 43.79,1.88 ; H1.1 43.79,8.59 ; H1.1 47.14,5.24 ; 4.86,21.01 H2.1 ; H2.1 11.56,21.01 ; H2.1 8.21,24.37 ; H2.1 8.21,17.66 ; C32.2 31.63,22.31 v1(31.72,22.4) ; 34.29,50.96 J1.6 ; J1.6 36.05,50.96 ; J1.6 35.17,52.39 ; J1.6 35.17,49.54 ; C33.2 22.17,24.17 22.32,24.02 22.32,23.79 v1(22.44,23.67) ; C56.2 v1(20.84,31.92) ; 22.67,34.67 v1(22.67,34.71) 22.98,35.02 C53.2 C54.2 23.22,34.13 22.67,34.67
  vias: v1(0.73,66.24) v1(0.73,63.7) v1(0.73,61.16) v1(0.73,58.62) v1(0.73,56.08) v1(0.73,53.54) v1(0.73,51) v1(0.73,48.46) v1(0.73,45.92) v1(0.73,43.38) v1(0.73,40.84) v1(0.73,38.3) v1(0.73,35.76) v1(0.73,33.22) v1(0.73,30.68) v1(0.73,28.14) v1(0.73,25.6) v1(0.73,23.06) v1(0.73,20.52) v1(0.73,17.98) v1(0.73,15.44) v1(0.73,12.9) v1(0.73,10.36) v1(0.73,7.82) v1(0.73,5.28) v1(0.73,2.74) v1(0.73,0.73) v1(2.48,54.15) v1(2.51,9.26) v1(2.51,7.08) v1(2.56,56.38) v1(2.63,66.24) v1(2.68,61) v1(2.71,15.23) v1(3.29,13.15) v1(3.29,10.61) v1(3.37,2.76) v1(3.55,0.76) v1(4.87,14.19) v1(4.92,9.98) v1(5.05,12.19) v1(5.1,7.97) v1(5.17,66.24) v1(5.15,63.44) v1(5.45,57.75) v1(5.53,55.87) v1(5.91,2.76) v1(5.99,25.52) v1(6.09,0.76) v1(6.11,48.25) v1(6.19,39.29) v1(6.32,26.71) v1(6.7,40.3) v1(6.72,6.22) v1(6.9,4.21) v1(6.98,41.83) v1(7.1,46.93) v1(7.28,62.07) v1(7.41,25.44) v1(7.41,14.19) v1(7.46,29.13) v1(7.46,9.98) v1(7.59,12.19) v1(7.64,7.97) v1(7.71,66.24) v1(8.09,30.27) v1(8.27,60.75) v1(8.25,41.8) v1(8.45,2.76) v1(8.63,0.76) v1(8.86,38.27) v1(9.26,6.22) v1(9.36,48.25) v1(9.36,31.54) v1(9.49,40.56) v1(9.44,4.21) v1(9.62,36.75) v1(9.74,58.21) v1(9.82,55.82) v1(10,26.71) v1(9.95,14.19) v1(10,9.98) v1(10.13,12.19) v1(10.18,7.97) v1(10.25,66.24) v1(10.61,64.1) v1(10.56,18.03) v1(10.89,29.63) v1(10.99,2.76) v1(11.14,31.54) v1(11.14,28.75) v1(11.17,0.76) v1(11.52,34.84) v1(11.65,39.54) v1(11.8,6.22) v1(11.98,4.21) v1(12.11,18.66) v1(12.31,52.55) v1(12.41,50.01) v1(12.41,36.75) v1(12.49,14.19) v1(12.54,20.74) v1(12.54,9.98) v1(12.67,48.15) v1(12.67,12.19) v1(12.79,66.24) v1(12.72,7.97) v1(13.05,23.79) v1(13.3,32.05) v1(13.55,26.84) v1(13.53,2.76) v1(13.71,0.76) v1(13.78,63.75) v1(13.78,43.05) v1(13.78,40.99) v1(13.81,35.6) v1(13.81,31.16) v1(13.86,60.75) v1(13.99,58.18) v1(13.94,55.92) v1(13.94,32.94) v1(14.34,6.22) v1(14.52,4.21) v1(14.7,18.97) v1(15.33,66.24) v1(15.33,36.75) v1(15.33,27.22) v1(15.41,20.47) v1(15.43,41.88) v1(15.46,24.68) v1(15.56,52.55) v1(15.59,34.59) v1(15.66,50.01) v1(15.76,15.08) v1(15.92,48.15) v1(15.97,38.14) v1(15.92,10) v1(16.07,2.76) v1(16.25,63.8) v1(16.25,0.76) v1(16.48,30.9) v1(16.48,22.65) v1(16.42,6.24) v1(16.58,44.62) v1(16.6,4.23) v1(16.63,58.13) v1(16.7,18.66) v1(16.73,32.3) v1(16.91,46.88) v1(16.98,36.87) v1(17.11,39.54) v1(17.11,27.48) v1(17.59,41.19) v1(17.87,66.24) v1(18.08,29.76) v1(18.25,34.08) v1(18.23,31.13) v1(18.23,9.49) v1(18.38,63.62) v1(18.46,60.62) v1(18.53,55.8) v1(18.56,20.85) v1(18.61,2.76) v1(18.69,48.08) v1(18.76,19.47) v1(18.79,0.76) v1(18.99,33.65) v1(18.96,6.24) v1(19.14,35.86) v1(19.14,4.23) v1(19.4,39.41) v1(19.5,10.48) v1(19.9,27.45) v1(19.98,9.59) v1(20.18,39.16) v1(20.36,47.01) v1(20.39,18.51) v1(20.41,66.24) v1(20.54,38.52) v1(20.54,33.7) v1(20.65,24.13) v1(21.17,33.37) v1(21.15,2.76) v1(21.33,0.76) v1(21.5,9.54) v1(21.5,6.24) v1(21.56,23.16) v1(21.68,4.23) v1(21.94,48.08) v1(22.14,56.99) v1(22.27,41.24) v1(22.52,33.29) v1(22.67,13.07) v1(22.95,66.24) v1(23.28,12.46) v1(23.69,2.76) v1(23.87,0.76) v1(24.02,30.5) v1(24.04,6.24) v1(24.22,26.69) v1(24.22,4.23) v1(24.65,52.49) v1(24.78,56.94) v1(24.73,49.95) v1(24.73,7.66) v1(24.96,31.92) v1(25.11,30.78) v1(25.11,30.02) v1(25.11,29.25) v1(25.11,28.49) v1(25.11,27.73) v1(25.11,26.97) v1(25.11,26.21) v1(25.37,20.74) v1(25.49,66.24) v1(25.44,43.63) v1(25.54,41.14) v1(25.9,31.92) v1(25.87,30.78) v1(25.87,30.02) v1(25.87,29.25) v1(25.87,28.49) v1(25.87,27.73) v1(25.87,26.97) v1(25.87,26.21) v1(26.13,25.11) v1(26.28,64) v1(26.28,58.34) v1(26.23,2.76) v1(26.41,0.76) v1(26.64,30.78) v1(26.64,30.02) v1(26.64,29.25) v1(26.64,28.49) v1(26.64,27.73) v1(26.64,26.97) v1(26.64,26.21) v1(27.4,30.78) v1(27.4,30.02) v1(27.4,29.25) v1(27.4,28.49) v1(27.4,27.73) v1(27.4,26.97) v1(27.4,26.21) v1(27.32,6.55) v1(27.5,4.54) v1(27.52,25.01) v1(27.63,31.87) v1(27.8,41.5) v1(27.78,39.29) v1(27.78,12.59) v1(27.88,51.83) v1(27.85,50.11) v1(27.85,9.31) v1(28.03,66.24) v1(28.08,18.18) v1(28.16,30.78) v1(28.16,30.02) v1(28.16,29.25) v1(28.16,28.49) v1(28.16,27.73) v1(28.16,26.97) v1(28.16,26.21) v1(28.64,13.38) v1(28.72,47.75) v1(28.72,45.31) v1(28.77,2.76) v1(28.92,58.29) v1(28.92,30.78) v1(28.92,30.02) v1(28.92,29.25) v1(28.92,28.49) v1(28.92,27.73) v1(28.92,26.97) v1(28.92,26.21) v1(28.95,0.76) v1(29.28,25.04) v1(29.28,18.76) v1(29.28,12.54) v1(29.48,32) v1(29.43,20.87) v1(29.56,10.86) v1(29.68,30.78) v1(29.68,30.02) v1(29.68,29.25) v1(29.68,28.49) v1(29.68,27.73) v1(29.68,26.97) v1(29.68,26.21) v1(29.86,7.97) v1(29.86,6.55) v1(30.04,4.54) v1(30.12,38.98) v1(30.17,13.73) v1(30.29,15.87) v1(30.39,41.65) v1(30.57,66.24) v1(30.7,31.97) v1(30.72,29.3) v1(30.8,25.65) v1(30.85,27.48) v1(30.93,19.7) v1(31.08,61.36) v1(31.08,12.57) v1(31.05,9.67) v1(31.31,2.76) v1(31.33,55.77) v1(31.49,0.76) v1(31.64,24.2) v1(31.97,47.75) v1(31.92,13.73) v1(32.17,20.47) v1(32.4,6.55) v1(32.6,15.13) v1(32.58,4.54) v1(32.76,39.21) v1(33.11,66.24) v1(33.16,41.62) v1(33.11,30.14) v1(33.26,22.93) v1(33.44,19.14) v1(33.52,23.79) v1(33.52,9.49) v1(33.67,44.52) v1(33.72,61.31) v1(33.77,27.4) v1(33.75,17.24) v1(33.72,10.64) v1(33.85,2.76) v1(33.98,55.72) v1(34.03,0.76) v1(34.18,19.78) v1(34.43,26.94) v1(34.61,48.2) v1(34.94,9.82) v1(34.94,6.55) v1(35.12,7.82) v1(35.12,4.54) v1(35.3,17.7) v1(35.58,41.62) v1(35.53,21.51) v1(35.58,16.45) v1(35.65,66.24) v1(35.73,38.83) v1(36.39,2.76) v1(36.57,50.23) v1(36.57,0.76) v1(36.64,52.85) v1(36.64,35.43) v1(37.07,44.27) v1(37.07,41.27) v1(37.05,25.09) v1(37.05,22.12) v1(37.05,17.9) v1(37.07,12.77) v1(37.18,61.03) v1(37.2,58.08) v1(37.15,19.6) v1(37.15,15.84) v1(37.3,55.85) v1(37.25,10.76) v1(37.51,37.28) v1(37.86,48.2) v1(37.81,9.57) v1(38.01,46.63) v1(38.19,66.24) v1(38.14,34.03) v1(38.17,6.98) v1(38.27,64) v1(38.24,27.3) v1(38.34,4.97) v1(38.9,22.62) v1(38.88,17.72) v1(38.93,2.76) v1(39.03,15.26) v1(39.11,0.76) v1(39.21,19.83) v1(39.21,13.25) v1(39.31,41.37) v1(39.49,27.22) v1(39.61,36.42) v1(39.77,52.83) v1(39.77,39.08) v1(39.72,11.6) v1(39.82,60.98) v1(39.84,58.03) v1(39.87,50.29) v1(39.94,55.8) v1(39.94,9.75) v1(40.1,25.04) v1(40.17,23.49) v1(40.12,7.74) v1(40.63,48.08) v1(40.73,66.24) v1(40.91,21.51) v1(41.39,16.33) v1(41.44,34.38) v1(41.47,2.76) v1(41.52,37.33) v1(41.57,14.32) v1(41.62,11.47) v1(41.65,0.76) v1(41.8,44.75) v1(42.18,18.31) v1(42.23,29.18) v1(42.26,24.3) v1(42.26,22.9) v1(42.38,25.44) v1(42.36,16.3) v1(42.87,41.5) v1(42.89,27.09) v1(43.09,34.38) v1(43.12,55.95) v1(43.15,31.34) v1(43.27,66.24) v1(43.25,46.63) v1(43.27,29.36) v1(43.27,15.03) v1(43.25,12.26) v1(43.4,38.27) v1(43.5,61.21) v1(43.42,10.25) v1(43.88,48.08) v1(43.91,20.36) v1(43.98,30.6) v1(44.16,32.86) v1(44.19,0.76) v1(44.24,48.94) v1(44.49,35.91) v1(44.67,25.95) v1(44.67,23.79) v1(44.67,18.84) v1(44.77,28.47) v1(44.9,24.58) v1(44.95,25.19) v1(45.18,14.9) v1(45.43,17.06) v1(45.61,29.23) v1(45.76,55.9) v1(45.81,66.24) v1(45.86,36.8) v1(45.94,20.74) v1(46.14,61.16) v1(46.19,27.86) v1(46.19,18.59) v1(46.47,24.89) v1(46.55,33.75) v1(46.57,31.13) v1(46.7,13.38) v1(46.73,0.76) v1(46.88,11.37) v1(47.08,17.32) v1(47.21,28.64) v1(47.49,57.17) v1(47.49,48.94) v1(47.54,54.15) v1(47.59,36.85) v1(47.87,40.53) v1(47.92,31.34) v1(47.92,28.8) v1(47.92,26.26) v1(47.92,23.72) v1(47.92,21.18) v1(47.92,18.64) v1(47.92,16.1) v1(47.92,13.56) v1(47.92,11.02) v1(48.07,6.62) v1(48.3,44.37) v1(48.3,2.84) v1(48.35,66.24) v1(48.4,47.03) v1(48.86,34.05) v1(49.19,42.33) v1(49.27,0.76) v1(49.93,21.56) v1(50,13.1) v1(50.1,19.55) v1(50.13,57.12) v1(50.18,54.1) v1(50.18,11.09) v1(51.25,66.21) v1(51.25,63.67) v1(51.25,61.13) v1(51.25,58.59) v1(51.25,56.05) v1(51.25,53.51) v1(51.25,50.97) v1(51.25,48.43) v1(51.25,45.89) v1(51.25,43.35) v1(51.25,40.81) v1(51.25,38.27) v1(51.25,35.73) v1(51.25,33.19) v1(51.25,30.65) v1(51.25,28.11) v1(51.25,25.57) v1(51.25,23.03) v1(51.25,20.49) v1(51.25,17.95) v1(51.25,15.41) v1(51.25,12.87) v1(51.25,10.33) v1(51.25,7.79) v1(51.25,5.25) v1(51.25,0.78)
VCC-1V2: length 8.4
  TOP w0.254: v1(15.92,36.28) R1.2 C2.2
  L3 w0.254: v1(15.92,36.28) 10.55,36.28 v1(9.49,35.22)
VCC-3V3-DEV: length 53.9
  TOP w0.508: FB2.2 17.62,19.83 14.57,22.88 v1(14.57,27.48) R42.2 ; v1(38.83,36.19) 38.83,35.11 R11.1 37.85,35.11 R15.1
  L3 w0.508: v1(14.57,27.48) 14.57,27.73 14.7,27.86 14.7,32.68 17.62,35.6 17.62,38.78 18.99,40.15 36.97,40.15 38.83,38.3 v1(38.83,36.19)
VCC-5V: length 100.8
  TOP w0.508: J7.4 5.09,46.6 C4.1 3.14,48.56 3.14,52.44 3.91,53.21 J8.4 ; J7.4 4.21,43.22 ; J7.4 5.09,40.15 C13.1 5.1,43.22 J7.4 ; J7.4 4.42,42.55 ; J4.4 39.99,43.63 C24.1 v1(40.83,46.37) ; J4.4 40.02,44.1 ; J4.4 40.4,44.1 ; J8.4 6.91,53.85 7.59,54.53 17.88,54.53 J2.4 ; J8.4 7.51,53.82 ; J8.4 6.31,53.82 ; R43.2 13.3,27.86 v1(13.17,27.73) ; 18.41,53.21 J2.4 ; J2.4 19.19,53.43 20.41,54.65 ; J2.4 19.79,53.82 ; J1.4 31.47,53.99 ; J1.4 32.51,54.25 ; J1.4 30.87,53.82 ; 43.75,53.99 J3.4 42.97,53.21
  L3 w0.508: v1(13.17,27.73) v1(5.17,27.73)
  L3 w1.016: v1(40.83,46.37) 39.97,45.51 31,45.51 J5.4 26.91,45.03 18.58,45.03 J6.4 14.69,45.31 7.18,45.31 J7.4
  vias: v1(11.83,17.09) v1(11.88,16) v1(12.72,17.11) v1(12.72,16.02) v1(19.88,17.21) v1(19.88,16.12) v1(20.62,17.32) v1(21.48,17.27)
VCCIO-CAM: length 45.9
  TOP w0.508: R21.2 46.47,23.9 Q2.1 46.04,23.64 45.43,23.03 v1(43.91,23.03) ; v1(24.8,10.99) 24.93,10.85 CC2.2 24.93,9.23 CC1.2 24.89,8.83 25.54,8.17 28.03,8.17 32.96,13.1 33.16,13.1 33.21,13.14 33.21,13.14 39.03,18.97 v1(39.72,18.97) 41.49,17.19 43.87,17.19 44.38,17.7 R24.2 R23.2 ; Q1.1 44.17,27.77 R19.2 43.3,26.33 v1(43.02,26.33)
  L3 w0.508: v1(39.72,18.97) 43.78,23.03 ; 43.78,23.03 43.73,23.03 43.15,23.62 43.02,23.74 v1(43.02,26.33) ; 43.78,23.03 v1(43.91,23.03)
  BOTTOM w0.254: JC1.52 v1(24.8,10.99)
AHD-ADC-REFCLK: length 2.2
  TOP w0.114: R34.1 36.29,27.55 36.59,27.26 36.59,26.9 37.2,26.3 OSC1.3
AHD-I2C-SCL: length 17.8
  TOP w0.114: R37.1 36.36,24.73 36.69,24.73 36.85,24.58 40.81,24.58 42.38,26.16 42.38,28.62 42.79,29.03 42.79,30.14 44.06,31.41 R20.1 44.68,31.34 44.68,30.36 Q1.3 44.71,30.14 R28.2
AHD-I2C-SDA: length 12
  TOP w0.114: R36.1 36.59,24.45 36.77,24.28 41.52,24.28 42.3,25.06 R22.1 43.89,25.06 Q2.3 46.15,26.91 R29.2
AHD-NCSI0-MCLK: length 16.4
  TOP w0.114: R35.1 36,25.98 36,25.81 36.06,25.75 36.41,25.4 36.41,25.21 v1(36.41,25.21)
  L3 w0.114: v1(32.93,13.66) 35.12,13.66 36.41,14.95 v1(36.41,25.21)
  BOTTOM w0.114: JC1.11 32.8,13.79 v1(32.93,13.66)
AHD-SYS-RSTN: length 1.1
  TOP w0.114: R27.1 R33.1
HD1: length 11.5
  TOP w0.254: J3.2 45.35,47.06 ESD1.1 45.08,44.55 J4.1 46.42,43.2 R3.1
HD2: length 11.4
  TOP w0.254: J1.2 33.07,48.24 34.05,47.26 ESD2.1 34.05,45.21 34.72,44.54 J5.1 34.71,43.22 R9.1
HD3: length 12.1
  TOP w0.254: R13.1 23.77,42.24 J6.1 22.78,45.96 ESD3.1 20.79,47.95 J2.2
HD4: length 11.8
  TOP w0.254: R17.1 11.12,42.25 11.09,42.27 J7.1 11.09,43.91 ESD4.1 8.47,51.18 J8.2
NCSI0-D0: length 25.5
  TOP w0.114: RN1.1 16.89,30.45 v1(15.92,29.48)
  L3 w0.114: v1(15.92,29.48) 15.99,29.41 15.99,27.96 24.98,18.97 28.41,18.97 v1(32.1,15.28)
  BOTTOM w0.114: v1(32.1,15.28) 32,15.19 JC1.15
NCSI0-D1: length 25
  TOP w0.114: v1(15.62,28.06) 15.62,28.66 16.2,29.23 16.2,29.25 16.28,29.33 16.28,29.44 16.49,29.65 RN1.2
  L3 w0.114: v1(15.62,28.06) 15.71,27.97 15.71,27.6 24.73,18.59 28.29,18.59 31.46,15.41 v1(31.46,15.28)
  BOTTOM w0.114: JC1.17 31.6,15.15 v1(31.46,15.28)
NCSI0-D2: length 25.5
  TOP w0.114: RN1.3 16.37,28.85 v1(16.35,28.87)
  L3 w0.114: v1(34.38,15.54) 29.43,20.49 26.25,20.49 22.57,24.17 21.94,24.17 17.26,28.85 16.37,28.85 v1(16.35,28.87)
  BOTTOM w0.114: v1(34.38,15.54) 34.38,14.5 JC1.3
NCSI0-D3: length 24.8
  TOP w0.114: RN1.4 16.41,28.05 v1(16.35,28.11)
  L3 w0.114: v1(33.87,15.16) 33.87,15.54 29.31,20.11 25.37,20.11 17.36,28.11 v1(16.35,28.11)
  BOTTOM w0.114: v1(33.87,15.16) 34,15.03 34,14.48 JC1.5
NCSI0-D4: length 21.1
  TOP w0.114: RN2.1 v1(15.97,26.77)
  L3 w0.114: v1(15.97,26.77) 24.55,18.19 27.54,18.19 29.78,15.95 v1(29.78,15.41)
  BOTTOM w0.114: v1(29.78,15.41) 29.6,15.23 JC1.27
NCSI0-D5: length 20
  TOP w0.114: RN2.2 v1(15.97,25.97)
  L3 w0.114: v1(29.2,15.77) 27.14,17.82 24.11,17.82 v1(15.97,25.97)
  BOTTOM w0.114: JC1.29 v1(29.2,15.77)
NCSI0-D6: length 19.3
  TOP w0.114: RN2.3 v1(15.97,25.17)
  L3 w0.114: v1(28.4,15.18) 28.57,15.35 28.57,15.87 26.95,17.48 23.48,17.48 15.97,24.99 v1(15.97,25.17)
  BOTTOM w0.114: JC1.33 v1(28.4,15.18)
NCSI0-D7: length 18.3
  TOP w0.114: RN2.4 v1(15.97,24.37)
  L3 w0.114: v1(15.97,24.37) 23.38,16.96 26.97,16.96 28.06,15.87 v1(28.06,15.77)
  BOTTOM w0.114: v1(28.06,15.77) 28,15.71 JC1.35
NCSI0-D8: length 15
  TOP w0.114: RN3.1 22.39,14.86 22.83,14.42 24.03,14.42 24.15,14.53 24.15,15.02 24.03,15.13 23.24,15.13 22.9,15.47 v1(22.9,15.87)
  BOTTOM w0.114: JC1.39 27.2,15.33 26.13,16.4 23.13,16.4 22.9,16.17 v1(22.9,15.87)
NCSI0-D9: length 13.2
  TOP w0.114: v1(23.49,15.86) 23.51,15.89 23.51,16.07 23.21,16.38 22.91,16.38 22.8,16.49 22.8,16.74 22.91,16.86 23.47,16.86 23.59,16.97 23.59,17.2 23.47,17.31 22.89,17.31 22.77,17.43 22.77,17.66 22.89,17.77 23.47,17.77 23.59,17.89 23.59,18.11 23.47,18.23 22.84,18.23 22.7,18.37 22.7,18.56 22.79,18.65 23.09,18.65 23.19,18.74 RN3.2
  BOTTOM w0.114: v1(23.49,15.86) 23.21,15.58 23.21,15.28 23.32,15.16 23.67,15.16 23.99,15.49 23.99,15.81 24.18,16 25.92,16 26.8,15.12 JC1.41
NCSI0-D10: length 13.2
  TOP w0.114: RN3.3 23.99,19.19 23.67,18.87 23.67,18.66 23.82,18.51 24.83,18.51 24.9,18.44 24.9,16.08 24.79,15.97 24.56,15.97 24.44,16.08 24.44,17.98 24.33,18.09 24.1,18.09 23.99,17.98 23.99,15.72 24.22,15.49 24.43,15.49 v1(24.45,15.51)
  BOTTOM w0.114: JC1.45 26,15.47 25.85,15.62 24.56,15.62 v1(24.45,15.51)
NCSI0-D11: length 13
  TOP w0.114: v1(25.54,15.26) 25.9,15.26 26.2,15.56 26.2,18.14 26.09,18.26 25.86,18.26 25.75,18.14 25.75,15.78 25.63,15.66 25.45,15.66 25.31,15.8 25.31,18.47 25.43,18.59 25.9,18.59 25.99,18.68 25.99,18.87 25.87,18.99 24.9,18.99 24.79,19.11 RN3.4
  BOTTOM w0.114: JC1.47 25.57,14.51 25.57,15.23 v1(25.54,15.26)
NCSI0-D12: length 13.2
  TOP w0.114: v1(24.98,13.81) 24.86,13.81 24.53,14.14 24.53,15.06 24.65,15.18 25.04,15.18 25.23,14.99 25.23,14.8 25.35,14.69 25.35,13.77 25.46,13.66 25.69,13.66 25.8,13.77 25.8,14.69 25.92,14.8 26.23,14.8 26.64,15.21 26.64,15.39 26.75,15.5 26.85,15.5 26.97,15.61 26.97,15.84 26.85,15.96 26.75,15.96 26.64,16.07 26.64,16.3 26.75,16.41 26.85,16.41 26.97,16.53 26.97,16.76 26.85,16.87 26.75,16.87 26.64,16.99 26.64,17.21 26.75,17.33 26.85,17.33 26.97,17.44 26.97,17.67 26.85,17.79 26.75,17.79 26.64,17.9 26.64,18.13 26.75,18.24 26.85,18.24 26.97,18.36 26.97,18.59 26.85,18.7 26.75,18.7 26.07,19.38 RN4.1
  BOTTOM w0.114: JC1.51 24.8,14.15 24.98,13.96 v1(24.98,13.81)
NCSI0-D13: length 13.8
  TOP w0.114: RN4.2 26.87,19.24 27.24,18.87 27.24,15.18 26.11,14.05 26.11,13.89 26.24,13.77 26.45,13.77 27.55,14.87 27.71,14.87 27.87,14.71 27.87,14.54 26.76,13.43 24.65,13.43 v1(24.51,13.57)
  BOTTOM w0.114: v1(24.51,13.57) 24.4,13.68 JC1.53
NCSI0-D14: length 14.2
  TOP w0.114: RN4.3 27.67,17.75 27.78,17.64 28.25,17.64 28.36,17.52 28.36,17.29 28.25,17.18 27.78,17.18 27.67,17.06 27.67,16.84 27.78,16.72 28.25,16.72 28.36,16.61 28.36,16.38 28.25,16.26 27.78,16.26 27.67,16.15 27.67,15.39 28.21,14.85 28.21,14.22 27.07,13.07 24.22,13.07 v1(23.49,13.81)
  BOTTOM w0.114: v1(23.49,13.81) 23.6,13.93 JC1.57
NCSI0-D15: length 13.4
  TOP w0.114: v1(22.93,13.79) 23.89,12.83 24.55,12.83 24.63,12.74 27.35,12.74 28.79,14.19 28.79,17.72 28.47,18.05 RN4.4
  BOTTOM w0.114: JC1.59 23.2,14.06 v1(22.93,13.79)
NCSI0-PCLK: length 20.4
  TOP w0.114: v1(29.86,18.46) 29.86,19.2 30.19,19.53 R31.2 ; v1(22.06,22.65) 21.83,22.65 21.54,22.36 R26.2
  L3 w0.114: v1(33.2,15.24) 29.99,18.46 v1(29.86,18.46) 29.86,18.74 29.12,19.47 25.24,19.47 v1(22.06,22.65)
  BOTTOM w0.114: JC1.9 v1(33.2,15.24)
NCSI-I2C-SCL: length 24.2
  TOP w0.114: v1(44.9,26.54) 45.02,26.66 R19.1 45.02,27.8 Q1.2 45.88,28.31 R28.1
  L3 w0.114: v1(44.9,26.54) 45.46,25.98 45.46,23.54 35.04,13.12 34.17,13.12 34.04,12.99 34,12.95 34,12.95 v1(33.75,12.69)
  BOTTOM w0.114: JC1.8 33.6,12.55 v1(33.75,12.69)
NCSI-I2C-SDA: length 24.4
  TOP w0.114: 47,26.88 46.47,26.36 v1(46.12,26.36) ; 47,26.88 R29.1 ; 47,26.88 47,25.91 47.16,25.75 R21.1 46.41,25.44 Q2.2
  L3 w0.114: v1(34.28,12.52) 34.38,12.62 35.3,12.62 45.85,23.17 45.85,26.09 v1(46.12,26.36)
  BOTTOM w0.114: v1(34.28,12.52) 34,12.23 JC1.6
RSTN: length 21.7
  TOP w0.114: Q3.2 46.82,19.2 R30.1 46.9,18.46 R23.1 46.32,17.09 38.14,8.91 32.46,8.91 RC2.1
S_GND: length 43.5
  L3 w0.508: J8.1 8.79,49.33 17.95,49.33 19.19,50.57 J2.1 ; J3.1 43.75,50.57 42.51,49.33 32.59,49.33 31.47,50.45 J1.1
  BOTTOM w0.508: J1.1 31.47,50.6 30.45,49.58 30.45,49.56 30.09,49.19 FB12.1 20.67,49.19 19.19,50.67 J2.1
SS_GND: length 39.7
  TOP w0.508: J8.3 17.41,53.21 18.39,52.23 19.81,52.23 J2.3 FB13.1 29.98,53.21 31,52.19 32.05,52.19 J1.3 33.45,53.21 33.87,53.64 41.62,53.64 43.02,52.24 43.34,52.24 43.35,52.23 44.16,52.23 44.17,52.24 44.38,52.24 J3.3
N19621503: length 3.4
  TOP w0.114: R36.2 34.52,24.83 34.52,24.91 33.13,26.29 U2.72
N19621508: length 3.2
  TOP w0.114: R37.2 33.55,26.69 U2.73
N19621532: length 4.2
  TOP w0.114: U2.85 34.11,31.49 R38.2 R40.2
N19621534: length 3.9
  TOP w0.114: U2.86 34.46,31.89 34.74,32.17 R41.2 R39.2
N19621611: length 15.5
  TOP w0.206: R3.2 45.56,40.42 R8.2 42.04,40.42 41.29,39.67 34.19,39.67 32.86,38.34 32.86,37.48 32.48,37.1 C9.2
N19621702: length 7.9
  TOP w0.206: R9.2 R10.2 32.08,39.79 30.06,39.79 28.03,37.76 C11.2
N19621721: length 1.1
  TOP w0.114: C7.2 R16.2
N19621766: length 3
  TOP w0.206: R13.2 23.77,38.51 R14.2 23.71,38.38 C6.2
N19621772: length 4.7
  TOP w0.114: U2.36 22.17,27.49 19.21,30.45 RN1.8
N19621774: length 4.5
  TOP w0.114: RN1.7 19.5,29.65 22.07,27.09 U2.37
N19621776: length 4.4
  TOP w0.114: U2.38 21.83,26.69 19.67,28.85 RN1.6
N19621778: length 4.2
  TOP w0.114: RN1.5 19.83,28.05 21.6,26.29 U2.39
N19621780: length 3.8
  TOP w0.114: RN2.8 20.36,26.77 21.23,25.89 U2.40
N19621782: length 3.7
  TOP w0.114: RN2.7 20.27,25.97 20.75,25.49 U2.41
N19621784: length 2.9
  TOP w0.114: RN3.8 22.39,21.7 24,23.31 U2.47
